# Altium PCB Smart-Switch-v1.2.PcbDoc (part 3 of 3)
Units mm, origin at the board's own origin, x right, y up, seen from the top; angles counter-clockwise.
Board outline 37 x 35 mm, 4 copper layers (Top Layer, Power Layer, Ground Layer, Bottom Layer), stack 0.999 mm thick; 78 components, 45 nets, 242 pads, 262 vias.
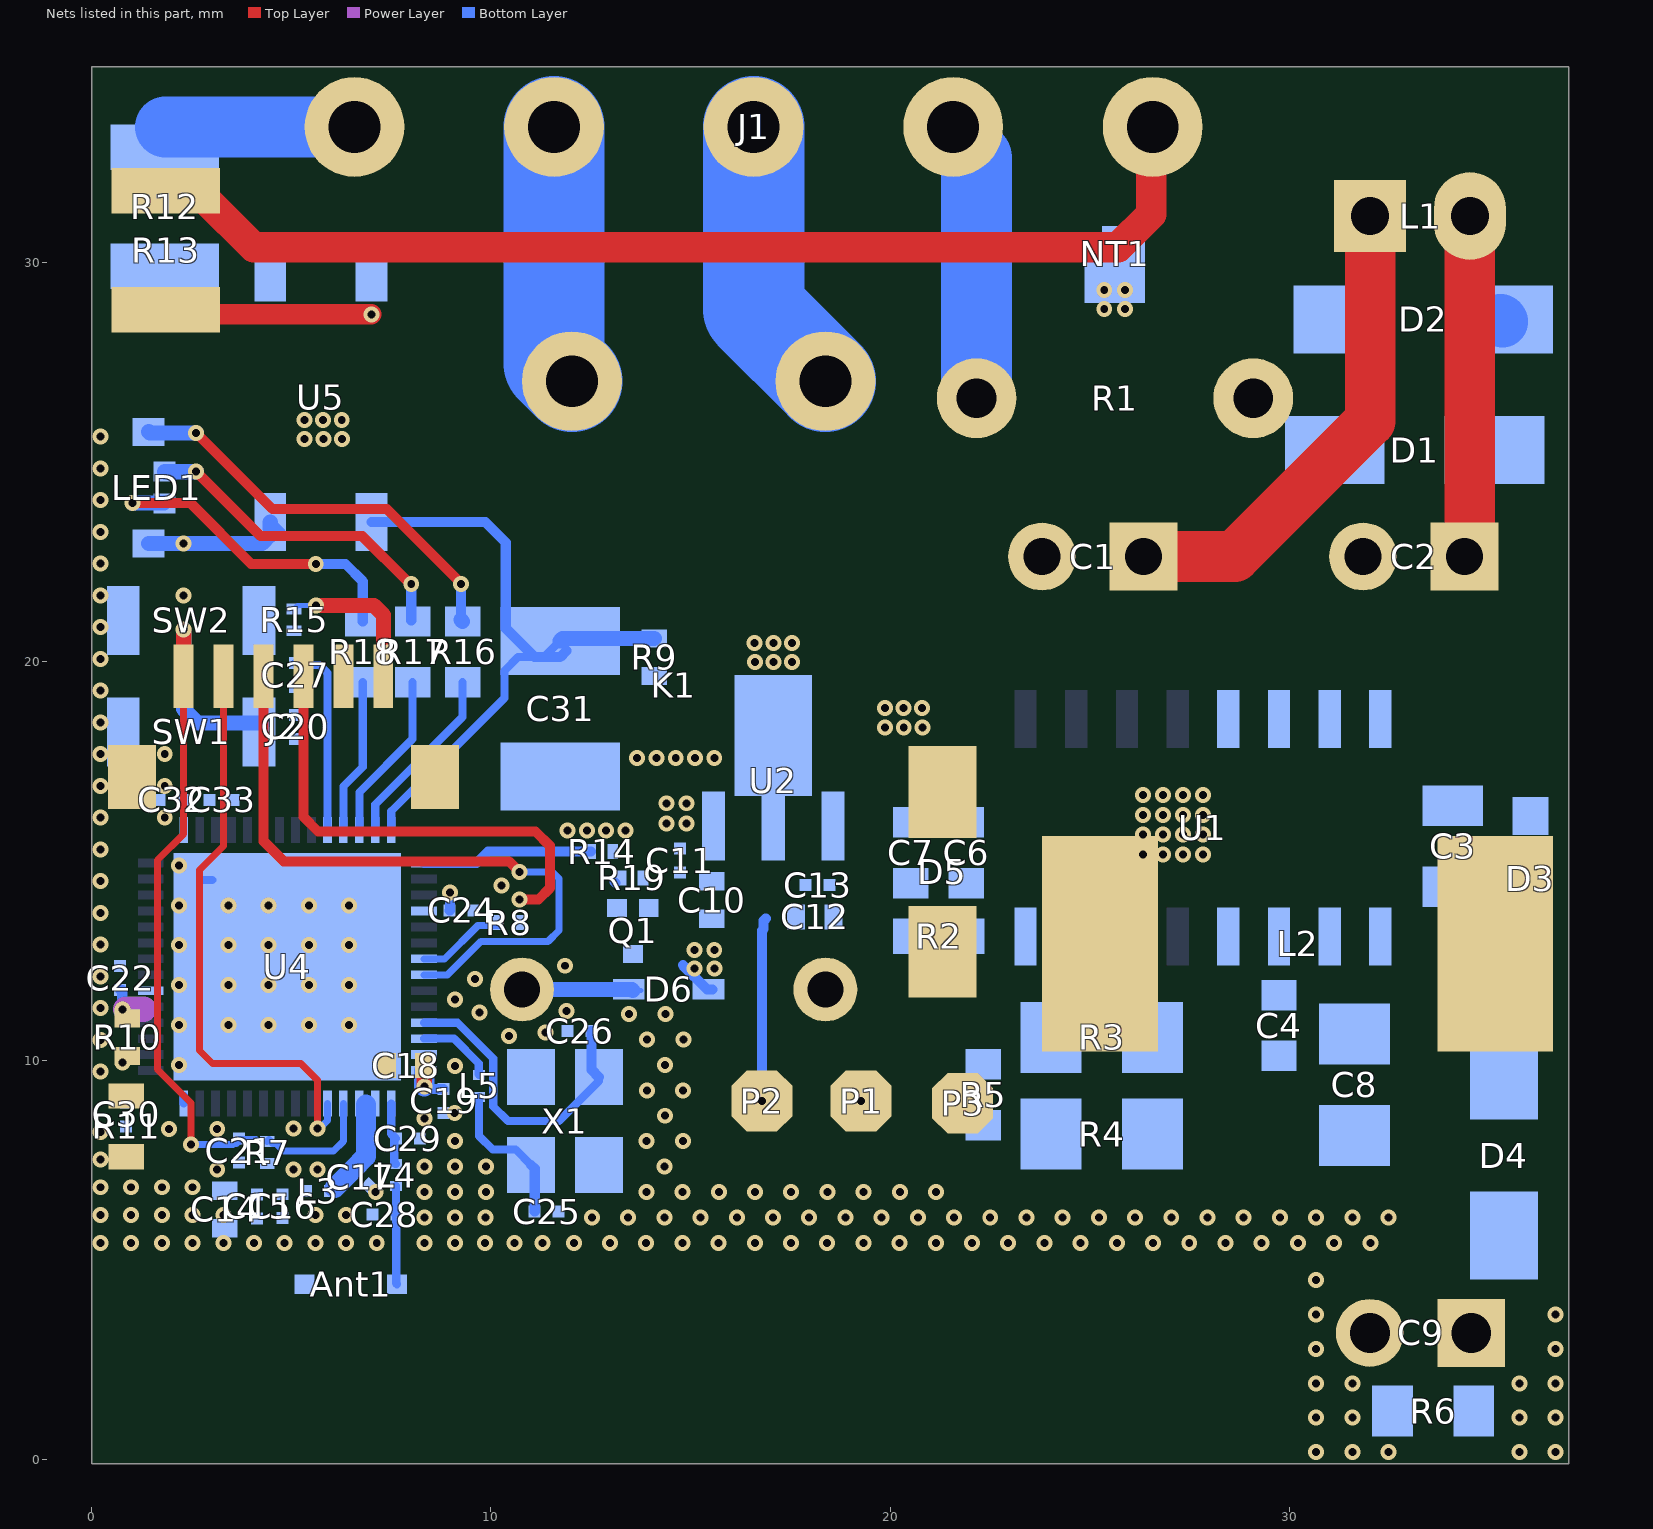
[diagram p4: the nets of this part, all layers, seen from the top]

## Part data (continued)
X1: library part X322540MPB4SI, "40MHz SMD Crystal Resonator 15pF SMD3225-4P Crystals ROHS", LCSC Part Number=C9010, Manufacturer="Yangxing Tech", ComponentLink1Description=LCSC, ComponentLink1URL=https://www.lcsc.com/product-detail/Crystals_Yangxing-Tech-X322540MPB4SI_C9010.html, Item Type=Crystal, Manufacturer Part Number=X322540MPB4SI

## Via types
v1: diameter 0.4, hole 0.2, Top Layer to Bottom Layer, tented both sides, 262 vias

## Nets (pads, with @x,y where several pads share a name; then routed paths per layer and width w, separated by ;. In a path a pad name is that pad's centre, name@x,y a point inside that pad or via, vN(x,y) a via of type N, cw(c..) or ccw(c..) an arc to the next point about the centre after c; other vN are vias at no path point)
3V3: C12.2 C13.2 C14.2 C15.2 C16.2 C18.2 C19.2 C22.2 C24.2 J2.1 L3.1 LED1.1 P2.1 R7.2 R10.1 R15.2 U2.2 U4.20 U4.46 U4.55 U4.56 U5.4 | length 15.2
  Top Layer w0.381: v1(5.618,21.408) 7.072,21.408 7.309,21.171 7.309,19.641 J2.1@7.302,19.635 ; v1(8.33,9.356) C18.2@8.33,9.881
  Power Layer w0.635: v1@0.852,11.287 1.301,11.287
  Bottom Layer w0.127: R15.2@5.066,21.322 5.152,21.408 v1(5.618,21.408)
  Bottom Layer w0.254: C22.2@0.707,11.769 0.762,11.769 v1@0.762,11.294 ; U5.4@4.47,23.494 U5.4@4.743,23.221 ; v1(8.33,9.356) 8.369,9.356 8.432,9.294 C19.2@8.815,9.294 ; C24.2@8.967,13.768 8.973,13.774 8.973,14.211 v1(8.979,14.217) ; v1(16.789,8.992) 16.789,13.264 16.832,13.307 16.832,13.508 16.886,13.561
  Bottom Layer w0.381: LED1.1@1.426,22.959 v1(2.302,22.959) v1(2.302,22.959) 4.261,22.96 4.47,23.169 U5.4@4.47,23.494
  Bottom Layer w0.508: U4.56@8.327,9.754 8.33,9.751 v1(8.33,9.356)
  other v1: 0.987,6.831 1.756,6.831 2.525,6.831 0.769,11.287 16.612,19.99 17.079,19.99 17.546,19.99 16.607,20.468 17.074,20.468 17.541,20.468
5V: C9.1 C10.2 C11.2 D4.2 D6.2 K1.1 L2.2 P1.1 R6.2 U2.3 | length 1
  Bottom Layer w0.254: 14.808,12.395 15.414,11.789 D6.2@15.554,11.789
  other v1: 35.765,0.196 36.672,0.196 35.765,1.058 36.672,1.058 35.765,1.919 36.672,1.919 36.672,2.78 36.672,3.642 19.272,8.992 15.101,12.309 15.602,12.309 15.095,12.776 15.596,12.776 14.4,15.949 14.901,15.949 14.4,16.452 14.901,16.452
BUTTON_1: C27.2 R15.1 SW2.2 U4.38 | length 4.9
  Bottom Layer w0.203: C27.2@5.091,19.963 5.142,19.912 5.706,19.912 5.902,19.716 U4.38@5.902,15.779
C_GND: C3.1 C4.1 C6.1 C7.1 C8.1 D5.1 L2.1 R3.1 U1.1 U1.2 U1.4 U1.6
  other v1: 26.336,15.164 26.837,15.164 27.338,15.164 27.839,15.164 26.336,15.666 26.837,15.666 27.338,15.666 27.839,15.666 26.336,16.156 26.837,16.156 27.338,16.156 27.839,16.156 26.336,16.658 26.837,16.658 27.338,16.658 27.839,16.658
EN: C20.2 C21.2 J2.6 R7.1 SW1.2 U4.4 | length 22.5
  Top Layer w0.178: J2.6@2.302,19.635 2.302,15.681 1.65,15.029 1.65,9.783 2.489,8.943 v1(2.489,7.902)
  Top Layer w0.381: J2.6@2.302,19.635 v1(2.302,20.803)
  Bottom Layer w0.178: v1(2.489,7.902) 2.493,7.898 3.537,7.898 3.567,7.927 3.627,7.927 3.671,7.971 3.671,8.032 4.114,8.032 ; R7.1@4.394,7.974 4.441,8.02 4.533,7.927 4.612,7.927 4.8,7.739 6.057,7.739 6.302,7.985 U4.4@6.302,8.929
  Bottom Layer w0.381: v1(2.302,20.803) 2.302,18.811 2.65,18.463 SW1.2@4.305,18.463
FB: R3.2 R5.1 U1.7
GND: Ant1.GND C1.2 C2.2 C9.2 C10.1 C11.1 C12.1 C13.1 C14.1 C15.1 C16.1 C17.1 C18.1 C19.1 C20.1 C21.1 C22.1 C24.1 C25.1 C26.1 C27.1 C28.1 C29.1 C30.1 C31.2 C32.1 C33.1 D5.2 J2.2 J2.MP1 J2.MP2 NT1.2 P3.1 Q1.2 R6.1 R9.1 R11.1 R19.1 SW1.1 SW2.1 U2.1 U4.57 X1.2 X1.4 | length 0.9
  Top Layer w0.127: J2.MP2@0.658,16.766 J2.MP2@1.002,17.11
  Bottom Layer w0.127: v1@11.841,12.368 v1(11.855,12.381)
  Bottom Layer w0.203: U4.57@2.728,14.528 U4.57@3.017,14.528
  Bottom Layer w1.27: C1.2@23.809,22.633 C1.2@23.891,22.715
  other v1: 30.674,0.196 31.581,0.196 32.488,0.196 30.674,1.058 31.581,1.058 30.674,1.919 31.581,1.919 30.674,2.78 30.674,3.642 30.674,4.503 0.218,5.436 0.987,5.436 1.756,5.436 2.525,5.436 3.294,5.436 4.063,5.436 4.832,5.436 5.601,5.436 6.37,5.436 7.139,5.436 8.331,5.436 9.1,5.436 9.855,5.436 10.589,5.436 11.295,5.436 12.076,5.436 12.983,5.436 13.89,5.436 14.797,5.436 15.704,5.436 16.611,5.436 17.518,5.436 18.425,5.436 19.332,5.436 20.24,5.436 21.147,5.436 22.054,5.436 22.961,5.436 23.868,5.436 24.775,5.436 25.682,5.436 26.589,5.436 27.496,5.436 28.403,5.436 29.311,5.436 30.218,5.436 31.125,5.436 32.032,5.436 8.331,6.073 9.1,6.073 9.865,6.073 12.532,6.073 13.439,6.073 14.346,6.073 15.253,6.073 16.16,6.073 17.068,6.073 17.975,6.073 18.882,6.073 19.789,6.073 20.696,6.073 21.603,6.073 22.51,6.073 23.417,6.073 24.324,6.073 25.231,6.073 26.139,6.073 27.046,6.073 27.953,6.073 28.86,6.073 29.767,6.073 30.674,6.073 31.581,6.073 32.488,6.073 0.218,6.138 0.987,6.138 1.756,6.138 2.525,6.138 3.294,6.138 5.601,6.138 6.37,6.138 7.114,6.71 8.331,6.71 9.1,6.71 9.875,6.71 13.896,6.71 14.803,6.71 15.71,6.71 16.617,6.71 17.524,6.71 18.431,6.71 19.338,6.71 20.245,6.71 21.152,6.71 0.218,6.831 3.142,7.277 5.054,7.277 5.658,7.277 8.331,7.348 9.1,7.348 9.875,7.348 14.352,7.348 0.218,7.524 9.1,7.985 13.901,7.985 14.808,7.985 0.218,8.217 1.93,8.288 3.142,8.288 5.054,8.302 8.331,8.549 14.358,8.623 9.093,8.692 13.907,9.26 14.814,9.26 0.218,9.727 9.1,9.864 2.184,9.898 14.364,9.897 0.218,10.523 13.913,10.535 14.82,10.535 10.45,10.621 11.367,10.706 2.184,10.897 3.422,10.897 4.431,10.897 5.44,10.897 6.45,10.897 13.462,11.172 14.369,11.172 9.717,11.206 11.891,11.244 0.218,11.318 9.1,11.529 2.184,11.896 3.422,11.896 4.431,11.896 5.44,11.896 6.45,11.896 9.597,12.044 0.218,12.114 2.184,12.895 3.422,12.895 4.431,12.895 5.44,12.895 6.45,12.895 0.218,12.91 0.218,13.705 2.184,13.894 3.422,13.894 4.431,13.894 5.44,13.894 6.45,13.894 10.266,14.387 0.218,14.501 2.184,14.893 0.218,15.296 11.921,15.767 12.403,15.767 12.886,15.767 13.369,15.767 0.218,16.092 1.828,16.092 0.218,16.888 1.828,16.888 13.665,17.583 14.148,17.583 14.63,17.583 15.113,17.583 15.596,17.583 0.218,17.683 1.828,17.683 19.876,18.356 20.343,18.356 20.81,18.356 0.218,18.479 19.871,18.834 20.339,18.834 20.806,18.834 0.218,19.275 0.218,20.07 0.218,20.866 0.218,21.661 2.302,21.661 0.218,22.457 0.218,23.253 0.218,24.048 0.218,24.844 5.333,25.575 5.8,25.575 6.267,25.575 0.218,25.64 5.328,26.053 5.795,26.053 6.262,26.053 25.367,28.84 25.885,28.84 25.367,29.307 25.885,29.307
GPIO37: C31.1 R9.2 U4.42 U5.3 | length 16.6
  Bottom Layer w0.203: U4.42@7.502,15.779 7.502,16.252 10.336,19.086 10.336,19.772 10.678,20.114 C31.1@11.041,20.114 ; C31.1@11.328,20.114 C31.1@11.735,20.52
  Bottom Layer w0.254: U5.3@7.01,23.494 9.866,23.494 10.373,22.987 10.373,20.837 11.096,20.114 11.328,20.114 11.735,20.114 C31.1@11.894,20.273
  Bottom Layer w0.381: C31.1@11.735,20.52 11.792,20.578 R9.2@14.094,20.578
GPIO38: R14.1 U4.43 | length 4.3
  Bottom Layer w0.254: U4.43@8.327,14.954 9.642,14.954 9.928,15.24 R14.1@12.501,15.24
I: J1.3 K1.4 | length 7.1
  Bottom Layer w2.54: J1.3@16.581,33.398 16.581,28.825 K1.4@18.38,27.026
IO0: J2.5 U4.5 | length 14.9
  Top Layer w0.178: J2.5@3.302,19.635 3.302,15.379 2.699,14.776 2.699,10.256 3.021,9.934 5.236,9.934 5.658,9.513 v1(5.658,8.302)
  Bottom Layer w0.178: v1@5.658,8.305 5.708,8.305 5.902,8.5 U4.5@5.902,8.929
LED_B: R18.2 U4.39 | length 3.9
  Bottom Layer w0.203: U4.39@6.302,15.779 6.302,16.878 6.788,17.364 R18.2@6.788,19.482
LED_G: R17.2 U4.40 | length 4.3
  Bottom Layer w0.203: U4.40@6.702,15.779 6.702,16.729 8.035,18.062 R17.2@8.035,19.482
LED_R: R16.2 U4.41 | length 4.6
  Bottom Layer w0.203: U4.41@7.102,15.779 7.102,16.422 9.289,18.609 R16.2@9.289,19.482
LIVE: J1.2 R1.2 | length 7.4
  Bottom Layer w1.27: J1.2@21.581,32.898 J1.2@21.816,32.662
  Bottom Layer w1.778: J1.2@21.581,33.398 21.581,33.202 22.17,32.613 R1.2@22.17,26.6
NetAnt1_ANT#: Ant1.ANT# C28.2 L4.1 | length 2.5
  Bottom Layer w0.208: C28.2@7.604,6.15 7.62,6.166 L4.1@7.62,6.862 ; C28.2@7.62,6.159 7.629,6.15 7.629,4.44 ccw(c7.685,4.44) Ant1.ANT#@7.645,4.4
NetC1_1: C1.1 D2.1 L1.1 | length 12.2
  Top Layer w1.27: C1.1@26.349,22.633 28.633,22.633 32.028,26.028 L1.1@32.028,31.164
NetC2_1: C2.1 L1.2 U1.13 U1.14 U1.15 U1.16 | length 8.5
  Top Layer w1.27: C2.1@34.528,22.62 L1.2@34.528,31.164
NetC6_2: C6.2 R2.1 U1.8
NetC7_2: C7.2 R2.2
NetC8_2: C8.2 D3.1 D4.1 R4.2
NetC17_2: C17.2 L3.2 U4.2 U4.3 | length 2.3
  Bottom Layer w0.508: 6.084,6.814 C17.2@6.493,7.224 ; C17.2@6.539,7.273 6.869,7.604 6.869,8.896
NetC29_2: C29.2 L4.2 U4.1 | length 1.6
  Bottom Layer w0.208: U4.1@7.502,8.929 7.502,8.17 C29.2@7.62,8.052 ; C29.2@7.578,8.052 7.578,7.433 7.599,7.412 L4.2@7.62,7.412
NetC32_2: C32.2 C33.2 U4.29
NetD1_1: D1.1 D2.2 | length 0.1
  Bottom Layer w1.27: D2.2@35.281,28.575 cw(c35.281,28.51) D2.2@35.346,28.51
NetD1_2: D1.2 R1.1
NetD6_1: D6.1 K1.2 Q1.3 | length 3
  Bottom Layer w0.127: D6.1@13.554,11.764 D6.1@13.757,11.764
  Bottom Layer w0.381: K1.2@10.78,11.786 13.533,11.786 D6.1@13.554,11.764
NetL5_1: L5.1 U4.54 | length 1.9
  Bottom Layer w0.203: U4.54@8.327,10.554 9.075,10.554 9.694,9.935 9.694,9.667 9.703,9.658 L5.1@9.703,9.643
NetLED1_2: LED1.2 R18.1 | length 8.4
  Top Layer w0.254: v1(1.016,23.978) 2.464,23.978 3.996,22.445 v1(5.611,22.445)
  Bottom Layer w0.254: v1(5.611,22.445) 6.355,22.445 6.788,22.012 R18.1@6.788,21.006
  Bottom Layer w0.381: v1(1.016,23.978) LED1.2@1.807,23.978
NetLED1_3: LED1.3 R17.1 | length 8.2
  Top Layer w0.254: v1(2.616,24.759) 4.23,23.145 6.777,23.145 v1@7.909,22.014
  Bottom Layer w0.127: R17.1@8.003,21.038 R17.1@8.035,21.006
  Bottom Layer w0.254: R17.1@8.003,21.038 v1(8.003,21.946)
  Bottom Layer w0.381: LED1.3@1.826,24.759 v1(2.616,24.759)
NetLED1_4: LED1.4 R16.1 | length 10.4
  Top Layer w0.254: v1(2.616,25.73) 4.523,23.823 7.388,23.823 9.248,21.964 v1(9.248,21.946)
  Bottom Layer w0.254: R16.1@9.248,21.047 v1(9.248,21.946)
  Bottom Layer w0.381: LED1.4@1.426,25.759 1.454,25.73 v1(2.616,25.73) ; R16.1@9.248,21.047 R16.1@9.289,21.006
NetQ1_1: Q1.1 R14.2 R19.2 | length 0
  Bottom Layer w0.254: 13.097,14.479 13.123,14.453
NetR4_1: R4.1 R5.2
NetR8_1: R8.1 U4.49 | length 2.2
  Bottom Layer w0.178: U4.49@8.327,12.554 8.838,12.554 9.669,13.384 R8.1@10.189,13.384
NetR12_2: R12.2 U5.1
NetR13_2: R13.2 U5.2 | length 4.4
  Top Layer w0.508: R13.2@2.591,28.702 v1(7.01,28.702)
NEUTRAL: J1.1 NT1.1 R13.1 | length 27.8
  Top Layer w0.762: R13.1@1.854,31.792 2.644,31.792 R13.1@2.833,31.603 ; R13.1@2.833,31.602 4.056,30.379 25.713,30.379 26.546,31.212 26.546,33.363 J1.1@26.581,33.398
NTC_TEMP: C30.2 R10.2 R11.2 U4.14 | length 0.2
  Bottom Layer w0.203: U4.14@2.294,9.132 2.302,9.124 U4.14@2.302,8.929
  other v1: 0.769,9.954
O: J1.4 K1.3 | length 6.6
  Bottom Layer w2.54: J1.4@11.581,33.398 11.581,27.475 K1.3@12.03,27.026
RXD: J2.4 U4.50 | length 17.1
  Top Layer w0.254: J2.4@4.305,19.632 4.305,15.5 4.81,14.995 10.451,14.995 v1(10.719,14.728)
  Bottom Layer w0.178: U4.50@8.327,12.154 8.912,12.154 9.751,12.993 11.434,12.993 11.704,13.263 11.704,14.565 11.542,14.728 v1(10.719,14.728)
SWITCH: J1.5 R12.1 | length 4.8
  Bottom Layer w0.127: R12.1@1.829,32.884 R12.1@1.842,32.898
  Bottom Layer w1.524: R12.1@1.842,33.398 J1.5@6.581,33.398
TXD: J2.3 R8.2 | length 11.9
  Top Layer w0.254: J2.3@5.302,19.635 5.302,16.112 5.669,15.745 11.117,15.745 11.476,15.386 11.476,14.325 11.192,14.04 v1(10.719,14.04)
VCC: C3.2 C4.2 D3.2 U1.3
XTAL_IN: C25.2 L5.2 X1.1 | length 3.8
  Bottom Layer w0.203: L5.2@9.703,9.093 9.703,8.118 10.046,7.774 10.62,7.774 X1.1@11.005,7.39
  Bottom Layer w0.254: X1.1@11.005,7.39 11.097,7.297 C25.2@11.097,6.223
XTAL_OUT: C26.2 U4.53 X1.3 | length 7.8
  Bottom Layer w0.203: U4.53@8.327,10.954 9.16,10.954 10.058,10.055 10.058,8.858 10.427,8.49 11.704,8.49 12.206,8.992 12.705,9.49 X1.3@12.705,9.59
  Bottom Layer w0.254: C26.2@12.523,10.744 12.523,9.771 X1.3@12.705,9.59
pads on no net: U1.5 U1.9 U1.10 U1.11 U1.12 U4.6 U4.7 U4.8 U4.9 U4.10 U4.11 U4.12 U4.13 U4.15 U4.16 U4.17 U4.18 U4.19 U4.21 U4.22 U4.23 U4.24 U4.25 U4.26 U4.27 U4.28 U4.30 U4.31 U4.32 U4.33 U4.34 U4.35 U4.36 U4.37 U4.44 U4.45 U4.47 U4.48 U4.51 U4.52

## Polygon pours and split planes (outlines as drawn)
3V3 on Power Layer "3V3_L02_P004" (solid, remove dead copper, pour order 4): 8.586,9.108 8.719,9.241 8.719,10 8.588,10.131 3.107,10.131 2.911,10.327 2.911,17.718 3.223,18.03 7.957,18.03 8.324,17.663 8.324,13.572 8.488,13.407 9.45,13.407 9.635,13.593 9.635,17.621 10.044,18.03 19.046,18.03 19.22,18.204 19.22,20.913 18.976,21.157 7.323,21.157 6.715,21.765 4.281,21.765 4.064,21.982 4.064,23.116 3.812,23.368 2.491,23.368 1.376,23.368 1.152,23.144 1.152,9.764 0.668,9.28 0.668,6.542 2.815,6.542 2.815,7.251 1.782,7.251 1.491,7.541 1.491,8.73 1.869,9.108 3.067,9.108 7.718,9.108
GND on Power Layer "GND_L02_P006" (solid, remove dead copper, pour order 6): 7.798,23.825 8.099,23.524 24.659,23.524 24.659,15.164 24.659,10.693 33.344,10.693 33.344,-0.101 30.248,-0.101 30.248,5.105 0,5.105 0,26.567 7.798,26.567
5V on Power Layer "5V_L02_P003" (solid, pour order 3): 36.322,12.073 37,11.395 37,11.378 37,-0.101 33.503,-0.101 33.503,8.306 33.176,8.633 17.874,8.633 17.58,8.927 17.58,11.336 17.13,11.786 15.538,11.786 14.113,11.786 13.825,12.073 13.825,16.602 14.036,16.813 19.005,16.813 19.22,16.598 19.22,12.672 19.818,12.073
GND on Top Layer "GND_L01_P001" (solid, remove dead copper, pour order 1): 19.871,11.102 23.208,11.102 23.208,9.593 32.877,9.593 32.877,-0.101 30.248,-0.101 30.248,5.105 0,5.105 0,26.567 7.798,26.567 7.798,24.663 8.938,23.524 24.659,23.524 24.659,20.697 23.208,20.697 23.208,14.425 19.871,14.425
GND on Ground Layer "GND_L03_P002" (solid, remove dead copper, pour order 2): 24.318,23.495 24.663,23.149 24.663,21.501 24.663,19.507 25.012,19.158 28.102,19.158 28.483,19.54 28.483,23.206 28.8,23.524 32.484,23.524 32.791,23.216 32.791,19.533 33.166,19.158 37,19.158 37,-0.101 30.248,-0.101 30.248,5.105 0,5.105 0,26.567 7.798,26.567 7.798,23.825 8.128,23.495
GND on Bottom Layer "GND_L04_P000" (solid, pour order 0): 21.222,7.08 21.576,6.725 33.503,6.725 33.503,-0.101 30.248,-0.101 30.248,5.105 0,5.105 0,26.574 7.449,26.574 7.449,23.644 23.049,23.644 24.954,25.55 24.954,30.221 26.273,30.221 26.273,25.255 24.659,23.644 24.659,20.697 24.659,20.041 22.265,20.041 22.265,17.628 19.66,17.628 19.66,15.215 21.222,15.215

## Other copper
Top Layer:
  rectangle net C_GND: 20.461,11.582 27.839,13.882
  rectangle net C_GND: 25.273,16.383 37,20.049
  rectangle net C_GND: 24.067,10.229 31.115,20.049
  rectangle net C_GND: 23.813,10.229 32.877,20.049
  rectangle net 3V3: 0.572,10.833 1.211,11.496
  rectangle net GND: 0.218,21.615 2.325,21.712
  rectangle net GND: 1.777,16.008 1.883,17.683
  rectangle net 5V: 33.713,-0.101 37,15.629
  rectangle net NTC_TEMP: 0.572,8.879 1.206,10.351
  rectangle net GND: 3.023,10.49 6.833,14.3
Bottom Layer:
  rectangle net GND: 24.866,28.575 26.39,29.751
  region net NEUTRAL: 28.249,34.724 24.971,34.724 24.971,31.786 28.249,31.786
  rectangle net NEUTRAL: 24.987,30.241 26.289,34.648
  rectangle net 5V: 14.458,11.529 14.93,14.925
  rectangle net 5V: 14.582,11.529 15.864,13.049
  rectangle net 5V: 14.094,15.642 15.864,16.751
  rectangle net NetR4_1: 21.894,7.272 24.944,9.05
  rectangle net C_GND: 23.913,14.205 28.754,17.286
  rectangle net 5V: 14.582,14.11 15.864,14.925
  rectangle net 5V: 15.284,14.165 15.864,15.386
  rectangle net 3V3: 16.624,13.116 18.113,14.925
  rectangle net 3V3: 16.784,14.165 17.364,15.431
  rectangle net GND: 18.284,13.255 18.864,15.425
  rectangle net C_GND: 19.917,15.596 28.754,17.286
  rectangle net NetC7_2: 19.917,12.381 20.968,14.834
  rectangle net NetC6_2: 21.466,12.381 23.674,14.834
  rectangle net C_GND: 25.656,9.494 28.754,12.026
  rectangle net 5V: 34.093,-0.101 37,6.725
  rectangle net C_GND: 25.656,9.494 32.524,10.87
  rectangle net NetC8_2: 25.656,7.266 36.535,9.05
  rectangle net NetD1_1: 33.893,24.448 36.607,29.425
  rectangle net SWITCH: 0.469,32.314 3.277,34.48
  rectangle net 3V3: 0.557,11.077 0.986,11.919
  rectangle net 3V3: 0.718,6.501 2.789,7.153
  rectangle net NetQ1_1: 12.904,13.603 13.404,15.425
  rectangle net GND: 13.673,13.603 14.204,15.425
  rectangle net TXD: 10.59,13.279 10.86,14.04
  rectangle net NetC29_2: 7.387,7.902 7.77,8.202
  rectangle net 3V3: 4.209,6.882 4.579,7.424
  rectangle net EN: 3.538,7.839 4.689,8.225
  rectangle net 3V3: 0.718,6.501 5.514,6.972
  rectangle net NetC17_2: 5.814,6.501 6.268,6.957
  rectangle net 3V3: 8.002,13.644 8.873,13.898
  region net NTC_TEMP: 0.882,10.05 0.634,10.05 0.634,8.804 0.882,8.804
  rectangle net NetC32_2: 2.152,16.385 3.101,16.687
  rectangle net BUTTON_1: 3.779,19.808 5.251,20.907
  rectangle net EN: 3.779,17.377 5.241,18.237
  rectangle net NetC32_2: 2.192,15.454 2.412,16.687
  rectangle net 3V3: 0.557,11.644 1.802,11.864
  rectangle net NTC_TEMP: 0.71,8.804 2.412,9.254
  rectangle net 3V3: 4.881,21.187 5.608,21.631
  rectangle net 3V3: 16.107,16.636 18.04,21.031
  rectangle net LIVE: 19.912,31.786 23.19,34.724
  rectangle net GND: 4.941,18.514 5.241,19.513
  rectangle net NetR13_2: 6.61,28.276 7.41,30.469
  rectangle net NetC8_2: 34.38,8.537 36.535,13.458
  rectangle net C_GND: 28.018,9.494 28.754,16.899
  rectangle net FB: 21.894,9.494 24.944,11.472
  rectangle net C_GND: 25.656,9.494 26.382,15.977
  rectangle net FB: 23.913,9.494 24.944,13.842
  rectangle net NetD6_1: 13.053,11.529 13.964,12.903
  rectangle net NetC2_1: 33.432,17.83 35.432,23.483
  rectangle net NetC1_1: 30.031,27.725 32.982,32.064
  rectangle net NetD1_2: 28.523,24.448 32.982,27.086
  rectangle net NetR12_2: 0.469,28.276 4.87,30.474
  rectangle net GND: 5.034,4.4 5.659,5.858
  rectangle net NetC17_2: 6.592,8.604 7.212,8.929
  rectangle net NetC17_2: 6.592,8.604 7.212,9.254
  rectangle net 3V3: 8.002,9.495 8.652,10.264
  rectangle net VCC: 29.197,15.447 36.535,17.286
  rectangle net NetC2_1: 28.196,17.83 35.432,19.292
  rectangle net VCC: 29.197,11.264 30.318,14.465
  rectangle net C_GND: 30.736,9.494 33.928,15.052
  rectangle net C_GND: 31.724,13.842 36.535,15.052
  rectangle net VCC: 29.197,14.173 30.318,16.612
  region net NTC_TEMP: 0.956,9.249 0.956,9.181 0.769,9.181 0.769,9.398 0.856,9.398 0.856,9.349 ccw(c0.956,9.349)
  region net NTC_TEMP: 2.099,8.814 2.099,8.882 2.286,8.882 2.286,8.665 2.199,8.665 2.199,8.715 ccw(c2.099,8.715)
  region net GND: 2.059,14.817 ccw(c1.555,14.817) 1.555,15.321 1.518,15.321 1.518,15.5 cw(c1.613,15.5) 1.613,15.595 1.931,15.595 ccw(c2.319,15.595) 2.319,15.207 2.427,15.207 2.427,15.152 cw(c2.059,15.152) 2.059,14.784
  region net GND: 7.362,15.204 ccw(c7.362,15.708) 7.866,15.708 7.866,15.745 8.044,15.745 cw(c8.044,15.65) 8.14,15.65 8.14,15.314 ccw(c8.14,14.926) 7.752,14.926 7.752,14.836 7.697,14.836 cw(c7.697,15.204) 7.329,15.204

## Silkscreen, mask and mechanical layers (free items; w line width, h text height)
Top Overlay:
  text "3V" at 16.29,7.093 h1.02
  text "5V" at 18.684,7.097 h1.02
  text "GND" at 20.879,7.084 h1.02
Bottom Overlay:
  drawing of 50 lines, arcs and shapes, not listed
  text "GPIO" at 3.764,22.548 h0.76
  text "RESET" at 7.083,17.088 h0.76
  text "$" at 21.672,6.933 h1.02 r270
  text "$" at 8.88,5.512 h1.02 r270
Bottom Solder:
  lines w1.524: 11.581,27.475 11.581,33.398
  lines w1.778: 16.581,33.398 16.581,28.825 18.38,27.026
Dimensions:
  drawing of 295 lines, arcs and shapes, not listed
  text "Layer" at -4.176,83.058 h1.52
  text "Name" at 6.235,83.058 h1.52
  text "Material" at 29.851,83.058 h1.52
  text "Thickness" at 51.689,83.058 h1.52
  text "Constant" at 68.195,83.058 h1.52
  text "Board Layer Stack" at 82.669,83.058 h1.52
  text "Top Overlay" at 6.235,80.01 h1.52
  text "Top Solder" at 6.235,76.962 h1.52
  text "Solder Resist" at 29.851,76.962 h1.52
  text "0.010mm" at 51.689,76.962 h1.52
  text "3.8" at 68.195,76.962 h1.52
  text "1" at -4.176,73.914 h1.52
  text "Top Layer" at 6.235,73.914 h1.52
  text "0.035mm" at 51.689,73.914 h1.52
  text "Dielectric 2" at 6.235,70.866 h1.52
  text "PP-006" at 29.851,70.866 h1.52
  text "0.130mm" at 51.689,70.866 h1.52
  text "4.6" at 68.195,70.866 h1.52
  text "2" at -4.176,67.818 h1.52
  text "Power Layer" at 6.235,67.818 h1.52
  text "CF-004" at 29.851,67.818 h1.52
  text "0.035mm" at 51.689,67.818 h1.52
  text "Dielectric 1" at 6.235,64.77 h1.52
  text "FR-4" at 29.851,64.77 h1.52
  text "0.600mm" at 51.689,64.77 h1.52
  text "4.8" at 68.195,64.77 h1.52
  text "3" at -4.176,61.722 h1.52
  text "Ground Layer" at 6.235,61.722 h1.52
  text "CF-004" at 29.851,61.722 h1.52
  text "0.035mm" at 51.689,61.722 h1.52
  text "Dielectric 3" at 6.235,58.674 h1.52
  text "PP-006" at 29.851,58.674 h1.52
  text "0.130mm" at 51.689,58.674 h1.52
  text "4.6" at 68.195,58.674 h1.52
  text "4" at -4.176,55.626 h1.52
  text "Bottom Layer" at 6.235,55.626 h1.52
  text "0.035mm" at 51.689,55.626 h1.52
  text "Bottom Solder" at 6.235,52.578 h1.52
  text "Solder Resist" at 29.851,52.578 h1.52
  text "0.010mm" at 51.689,52.578 h1.52
  text "3.8" at 68.195,52.578 h1.52
  text "Bottom Overlay" at 6.235,49.53 h1.52
  text "Total board thickness:" at -4.176,46.482 h1.52
  text "1.019mm" at 51.689,46.482 h1.52
Board Outline:
  lines w0.127: 9.248,26.102 9.248,28.928 ccw(c8.994,28.928) 8.994,29.182 ccw(c8.994,28.928) 8.74,28.928 8.74,25.878 10.079,24.54 13.408,24.54 19.263,24.54 20.626,25.903 20.626,28.928 ccw(c20.372,28.928) 20.372,29.182 ccw(c20.372,28.928) 20.118,28.928 20.118,26.094 19.071,25.048 13.408,25.048 10.312,25.048 9.258,26.102 ; 23.724,28.928 23.724,25.844 22.928,25.048 21.388,25.048 ccw(c21.388,24.794) 21.134,24.794 ccw(c21.388,24.794) 21.388,24.54 23.119,24.54 24.232,25.652 24.232,28.944 ccw(c23.978,28.944) 23.978,29.198 ccw(c23.978,28.944) 23.724,28.944 ; 27.508,28.915 27.508,24.784 cw(c27.254,24.784) 27.254,24.53 cw(c27.254,24.784) 27,24.784 27,28.931 cw(c27.254,28.931) 27.254,29.185 cw(c27.254,28.931) 27.508,28.931 ; 0,-0.101 37,-0.101 37,34.899 0,34.899 0,-0.101 ; 0.406,27.457 ccw(c0.66,27.457) 0.66,27.203 0.765,27.203 7.824,27.203 ccw(c7.824,27.457) 8.078,27.457 ccw(c7.824,27.457) 7.824,27.711 0.765,27.711 0.66,27.711 ccw(c0.66,27.457) 0.406,27.457 ; 8.741,31.648 ccw(c8.995,31.648) 8.995,31.394 ccw(c8.995,31.648) 9.249,31.648 9.249,34.134 9.249,34.239 ccw(c8.995,34.239) 8.995,34.493 ccw(c8.995,34.239) 8.741,34.239 8.741,34.134 8.741,31.648 ; 13.741,31.648 ccw(c13.995,31.648) 13.995,31.394 ccw(c13.995,31.648) 14.249,31.648 14.249,34.134 14.249,34.239 ccw(c13.995,34.239) 13.995,34.493 ccw(c13.995,34.239) 13.741,34.239 13.741,34.134 13.741,31.648 ; 18.741,31.648 ccw(c18.995,31.648) 18.995,31.394 ccw(c18.995,31.648) 19.249,31.648 19.249,34.134 19.249,34.239 ccw(c18.995,34.239) 18.995,34.493 ccw(c18.995,34.239) 18.741,34.239 18.741,34.134 18.741,31.648 ; 23.741,31.648 ccw(c23.995,31.648) 23.995,31.394 ccw(c23.995,31.648) 24.249,31.648 24.249,34.134 24.249,34.239 ccw(c23.995,34.239) 23.995,34.493 ccw(c23.995,34.239) 23.741,34.239 23.741,34.134 23.741,31.648
Drill Drawing:
  circle w0.254: c-3.459,100.262 r0.847
  lines w0.254: -4.305,93.489 -2.612,93.489 -3.459,91.796 -4.305,93.489 ; -4.305,95.606 -2.612,95.606 -2.612,97.299 -4.305,97.299 -4.305,95.606 ; -4.305,103.226 -3.459,103.649 -2.612,103.226 -3.035,104.072 -2.612,104.919 -3.459,104.496 -4.305,104.919 -3.882,104.072 -4.305,103.226 ; -4.305,107.459 -3.882,107.459 -3.459,107.036 -3.035,107.459 -2.612,107.459 -3.035,107.882 -2.612,108.306 -3.035,108.306 -3.459,108.729 -3.882,108.306 -4.305,108.306 -3.882,107.882 -4.305,107.459 ; -4.305,111.269 -3.882,111.269 -3.882,110.846 -3.035,110.846 -3.035,111.269 -2.612,111.269 -2.612,112.116 -3.035,112.116 -3.035,112.539 -3.882,112.539 -3.882,112.116 -4.305,112.116 -4.305,111.269
  lines w0.381: -5.824,90.653 174.772,90.653 ; -5.824,113.513 174.772,113.513 ; 8.168,86.843 8.168,117.323 ; 23.15,86.843 23.15,117.323 ; 51.082,86.843 51.082,117.323 ; 63.931,86.843 63.931,117.323 ; 82.57,86.843 82.57,117.323 ; 120.659,86.843 120.659,117.323 ; 135.641,86.843 135.641,117.323 ; 154.584,86.843 154.584,117.323 ; -5.824,86.843 174.772,86.843 174.772,117.323 -5.824,117.323 -5.824,86.843
  text "Symbol" at -3.538,114.656 h1.83
  text "Count" at 9.311,114.656 h1.83
  text "Hole Size" at 24.293,114.656 h1.83
  text "Plated" at 52.225,114.656 h1.83
  text "Hole Type" at 65.074,114.656 h1.83
  text "Drill Layer Pair" at 83.713,114.656 h1.83
  text "Via/Pad" at 121.802,114.656 h1.83
  text "Pad Shape" at 136.784,114.656 h1.83
  text "Template" at 155.727,114.656 h1.83
  text "2" at 9.311,110.846 h1.52
  text "35.43mil (0.900mm)" at 24.293,110.846 h1.52
  text "PTH" at 52.225,110.846 h1.52
  text "Round" at 65.074,110.846 h1.52
  text "Top Layer - Bottom Layer" at 83.713,110.846 h1.52
  text "Pad" at 121.802,110.846 h1.52
  text "Rounded" at 136.784,110.846 h1.52
  text "c160h90" at 155.727,110.846 h1.52
  text "2" at 9.311,107.036 h1.52
  text "37.40mil (0.950mm)" at 24.293,107.036 h1.52
  text "PTH" at 52.225,107.036 h1.52
  text "Round" at 65.074,107.036 h1.52
  text "Top Layer - Bottom Layer" at 83.713,107.036 h1.52
  text "Pad" at 121.802,107.036 h1.52
  text "(Mixed)" at 136.784,107.036 h1.52
  text "(Mixed)" at 155.727,107.036 h1.52
  text "4" at 9.311,103.226 h1.52
  text "36.22mil (0.920mm)" at 24.293,103.226 h1.52
  text "PTH" at 52.225,103.226 h1.52
  text "Round" at 65.074,103.226 h1.52
  text "Top Layer - Bottom Layer" at 83.713,103.226 h1.52
  text "Pad" at 121.802,103.226 h1.52
  text "(Mixed)" at 136.784,103.226 h1.52
  text "(Mixed)" at 155.727,103.226 h1.52
  text "4" at 9.311,99.416 h1.52
  text "39.37mil (1.000mm)" at 24.293,99.416 h1.52
  text "PTH" at 52.225,99.416 h1.52
  text "Round" at 65.074,99.416 h1.52
  text "Top Layer - Bottom Layer" at 83.713,99.416 h1.52
  text "Pad" at 121.802,99.416 h1.52
  text "(Mixed)" at 136.784,99.416 h1.52
  text "(Mixed)" at 155.727,99.416 h1.52
  text "7" at 9.311,95.606 h1.52
  text "51.18mil (1.300mm)" at 24.293,95.606 h1.52
  text "PTH" at 52.225,95.606 h1.52
  text "Round" at 65.074,95.606 h1.52
  text "Top Layer - Bottom Layer" at 83.713,95.606 h1.52
  text "Pad" at 121.802,95.606 h1.52
  text "Rounded" at 136.784,95.606 h1.52
  text "c250h130" at 155.727,95.606 h1.52
  text "262" at 9.311,91.796 h1.52
  text "7.87mil (0.200mm)" at 24.293,91.796 h1.52
  text "PTH" at 52.225,91.796 h1.52
  text "Round" at 65.074,91.796 h1.52
  text "Top Layer - Bottom Layer" at 83.713,91.796 h1.52
  text "Via" at 121.802,91.796 h1.52
  text "Rounded" at 136.784,91.796 h1.52
  text "v40h20m0mx0" at 155.727,91.796 h1.52
  text "281 Total" at 9.311,87.986 h1.52

## Dimensions
0,34.899 to 37,34.899 on Dimensions
37,-0.101 to 37,34.899 on Dimensions